# Altium PCB sensor-node-pcbdoc.pcbdoc
Units mil, origin at the board's own origin, x right, y up, seen from the top; angles counter-clockwise.
Board outline 3355 x 3685 mil, 2 copper layers (Top Layer, Bottom Layer); 28 components, 35 nets, 175 pads, 56 vias.
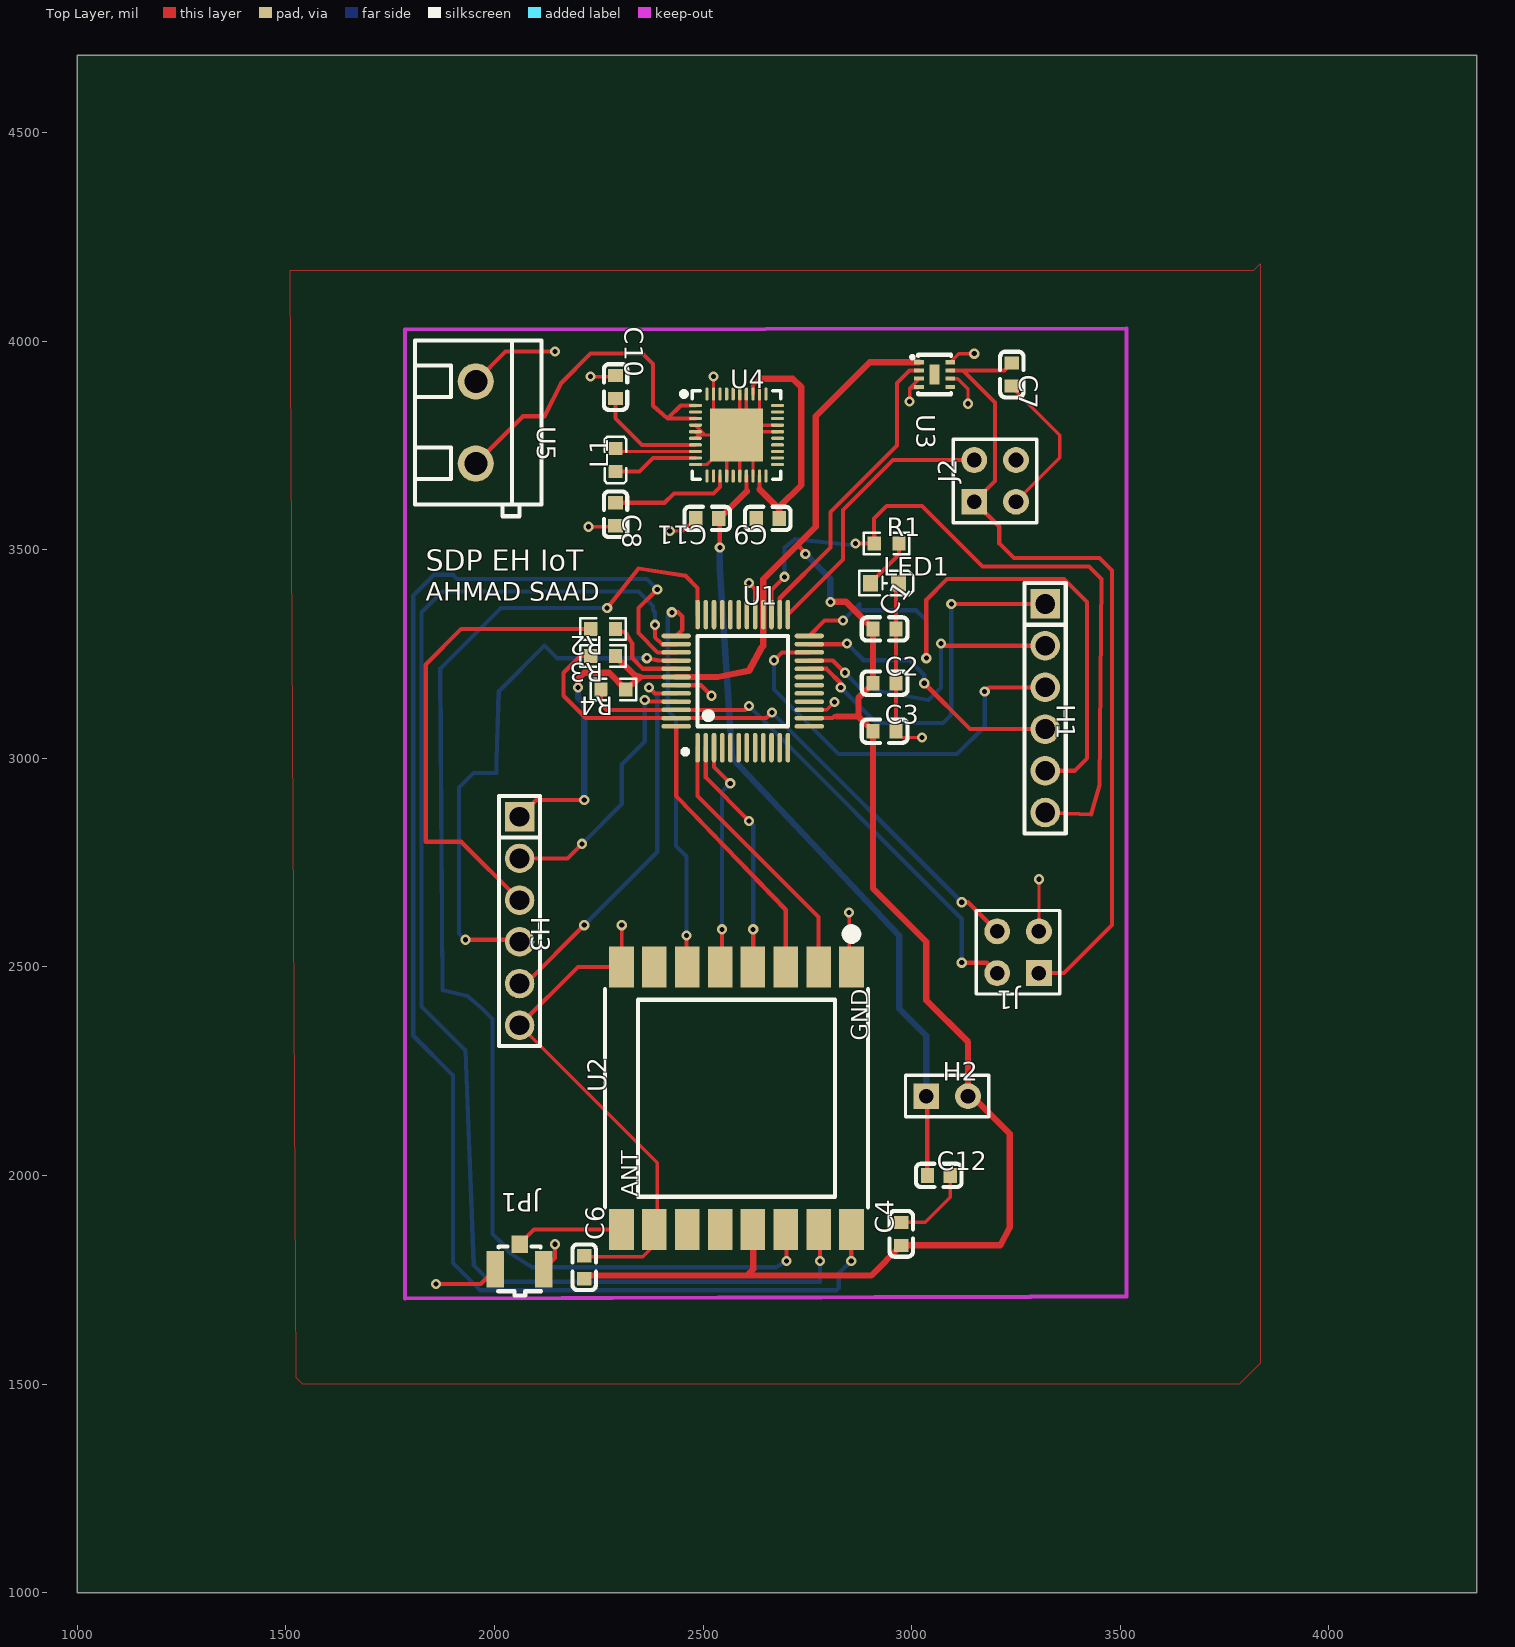
[diagram p0: Top Layer view]
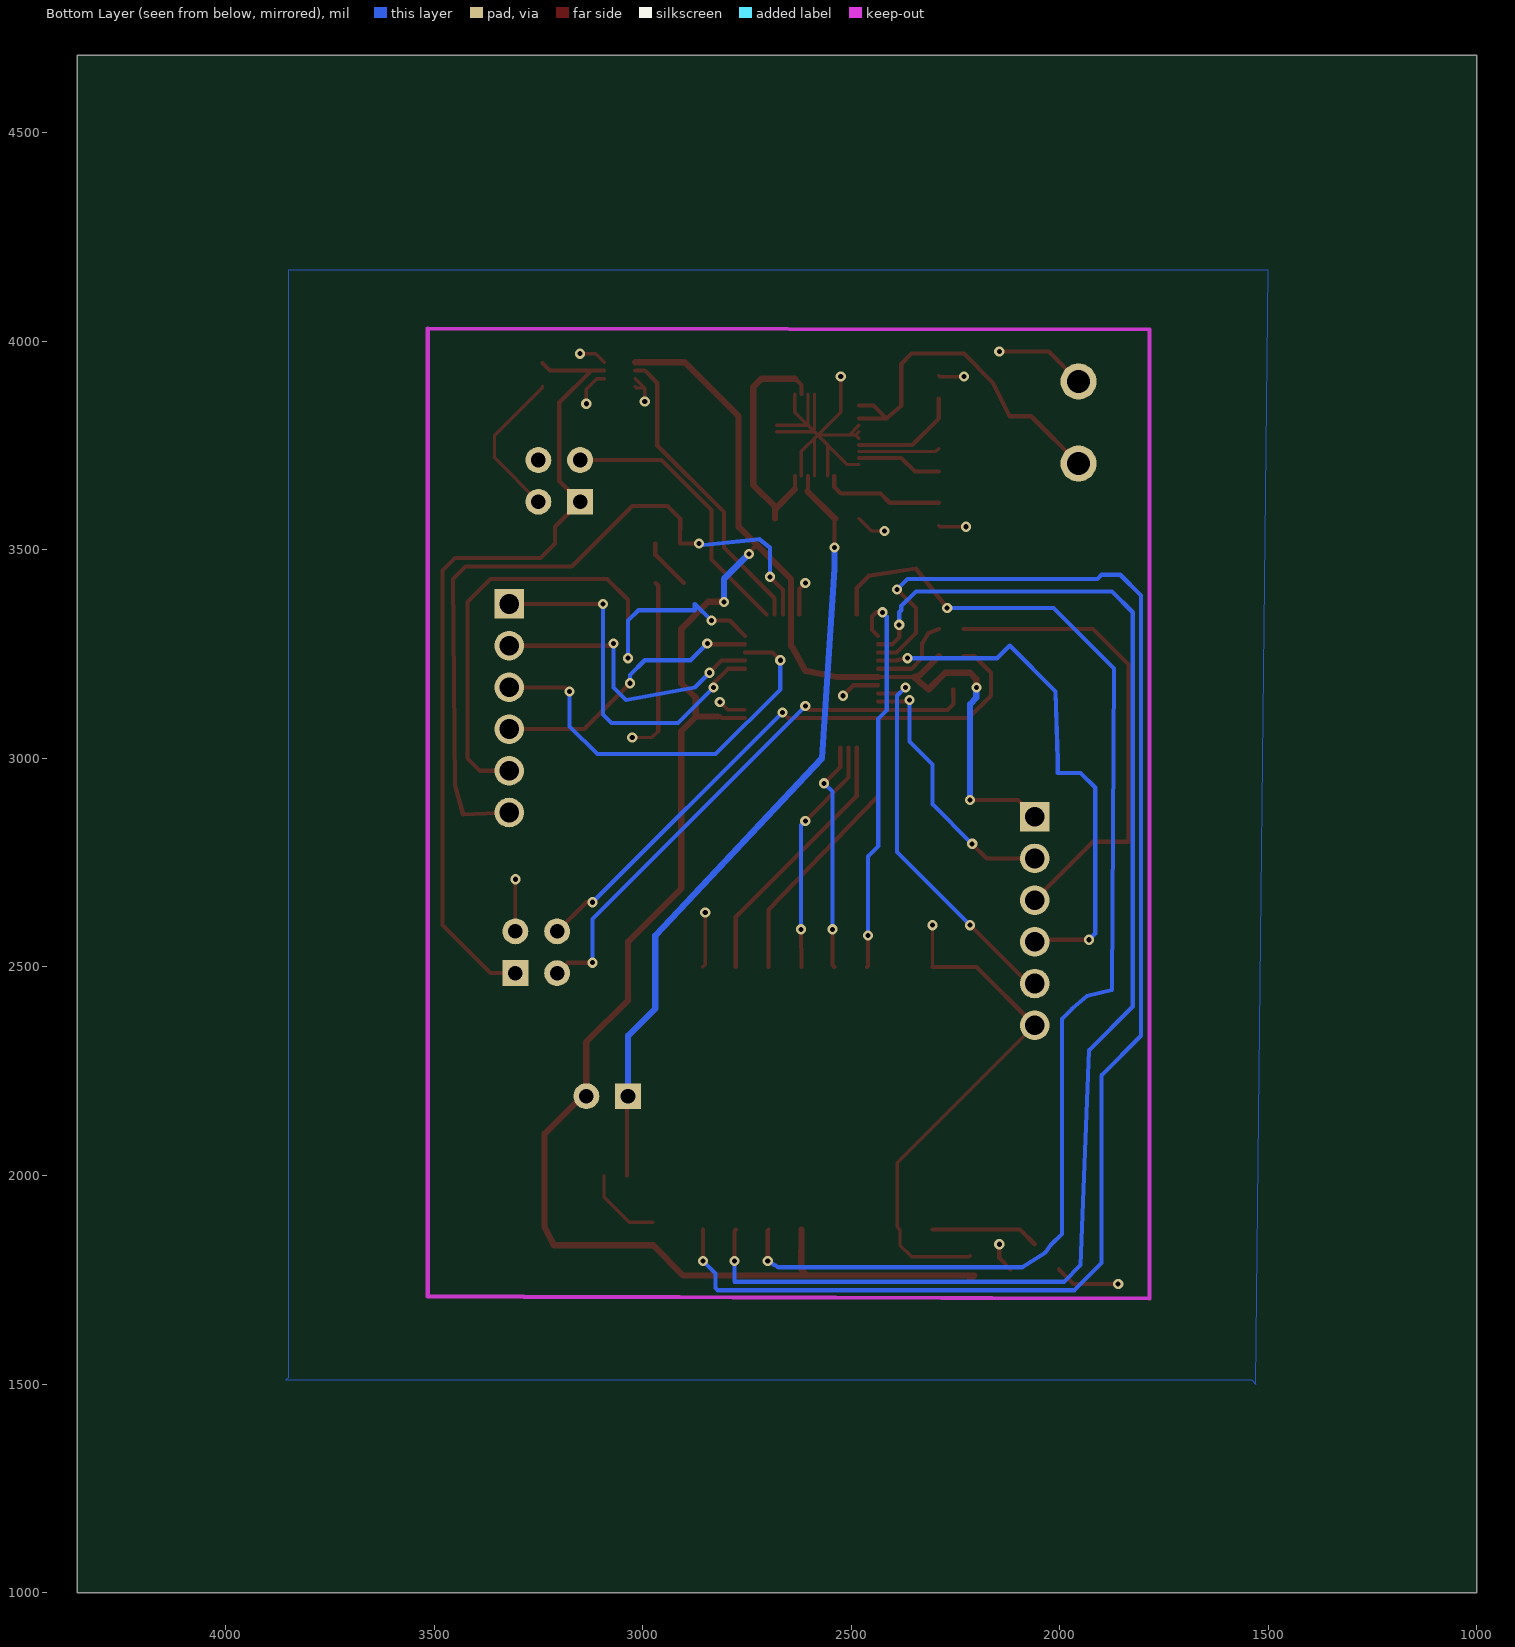
[diagram p1: Bottom Layer view, seen from below]

## Layer stack, top to bottom
Top Layer: signal copper (thickness not stored)
Dielectric: dielectric 12.6, FR-4, Dk 4.8
Bottom Layer: signal copper (thickness not stored)

## Board outline
4355,1000 1000,1000 1000,4685 4355,4685

## Components (designator, comment, footprint, x,y, rotation, side; value= is the part's Value field where it differs from the comment)
C1 "0.1u" C0603 2935,3310 r0 top
C2 "0.1u" C0603 2935,3180 r0 top
C3 "0.1u" C0603 2935,3065 r0 top
C4 "10u" C0603 2975,1860 r90 top
C6 "10u" C0603 2215,1780 r90 top
C7 "10u" C0603 3240,3920 r270 top
C8 "10u" C0603 2290,3585 r270 top
C9 "1F" C0603 2655,3575 r180 top
C10 "22u" C0603 2290,3890 r270 top
C11 "47u" C0603 2510,3575 r180 top
C12 "47u" C0603 3065,2000 r0 top
H1 "A2541WV-6P" HDR-TH_6P-P2.54-V-M-1 3320,3120 r270 top
H2 "HDR-F-2.54_1x2" HDR-F-2.54_1X2 3085,2190 r0 top
H3 "A2541WV-6P" HDR-TH_6P-P2.54-V-M-1 2060,2610 r270 top
J1 "HDR-M-2.54_2x2" HDR-M-2.54_2X2 3255,2535 r180 top
J2 "HDR-M-2.54_2x2" HDR-M-2.54_2X2 3200,3665 r90 top
JP1 "U.FL-R-SMT-1(80)" RF-SMD_FRF05002-JSS103M 2060,1805 r180 top
L1 "10u" L0603 2290,3715 r90 top
LED1 "YLED0603R" LED0603-FD 2935,3420 r0 top
R1 "1k" R0603 2940,3515 r0 top
R2 "4.7K" R0603 2260,3310 r180 top
R3 "10k" R0603 2260,3245 r180 top
R4 "10k" R0603 2285,3165 r180 top
U1 "ATMEGA4809-AUR" TQFP-48_L7.0-W7.0-P0.50-LS9.0-BL 2595,3185 r0 top
U2 "SX1276S9S+T-X1" WIRELM-SMD_SX1278S165SY-T-X1 2580,2185 r90 top
U3 "MIC94069YML-TR" MLF-8_L2.0-W2.0-P0.50-BL-EP 3055,3920 r270 top
U4 "AEM10330-QFN" WQFN-40_L5.0-W5.0-P0.40-TL-EP3.2 2580,3775 r0 top
U5 "KF301-5.0-2P" CONN-TH_P5.00_KF301-5.0-2P 1955,3805 r270 top

## Footprints (in the part's own frame and the unit in brackets; to place one, negate y for a bottom-side part, rotate by r counter-clockwise, add the part's x,y. Pads: shape width x height; smd on the part's side, far side on the other; paste and mask are expansions set on the pad)
C0603 [mm]
  rect 0.8x0.9 smd paste+0 mask+0.051: 1(-0.7,0) 2(0.7,0)
  silkscreen extent -1.39,-0.71 1.39,0.71
CONN-TH_P5.00_KF301-5.0-2P [mm]
  round 2.2 hole 1.4 paste+0 mask+0.05: 1(-2.5,0) 2(2.5,0)
  silkscreen extent -5,-3.7 5.71,4
HDR-F-2.54_1X2 [mil]
  rect 62x62 hole 35 paste+0 mask+2: 1(-50,0)
  round 62 hole 35 paste+0 mask+2: 2(50,0)
  silkscreen extent -100,-49 100,50
HDR-M-2.54_2X2 [mil]
  rect 62x62 hole 35 paste+0 mask+2: 1(-50,50)
  round 62 hole 35 paste+0 mask+2: 2(50,50) 3(-50,-50) 4(50,-50)
  silkscreen extent -100,-100 100,100
HDR-TH_6P-P2.54-V-M-1 [mm]
  rect 1.8x1.8 hole 1.2 paste+0 mask+0.051: 1(-6.35,0)
  round 1.8 hole 1.2 paste+0 mask+0.051: 2(-3.81,0) 3(-1.27,0) 4(1.27,0) 5(3.81,0) 6(6.35,0)
  silkscreen extent -7.62,-1.25 7.62,1.25
L0603 [mm]
  rect 0.8x0.864 smd paste-100 mask+0.051: 1(-0.7,0) 2(0.7,0)
  silkscreen extent -1.42,-0.65 1.42,0.65
LED0603-FD [mm]
  rect 0.9x1 smd paste+0 mask+0.051: 1(-0.85,0) 2(0.85,0)
  silkscreen extent -1.55,-0.75 1.75,0.75
MLF-8_L2.0-W2.0-P0.50-BL-EP [mm]
  rect 0.25x0.6 smd paste+0 mask+0.051: 1(-0.75,-0.95) 2(-0.25,-0.95) 3(0.25,-0.95) 4(0.75,-0.95) 5(0.75,0.95) 6(0.25,0.95) 7(-0.25,0.95) 8(-0.75,0.95)
  rect 1.2x0.6 smd paste+0 mask+0.051: 9(0,0)
  silkscreen extent -1.2,-1.45 1.2,1
R0603 [mil]
  rect 31.75x34.02 smd paste-3937.01 mask+2: 1(-29.66,0) 2(29.66,0)
  silkscreen extent -55,-26 55,26
RF-SMD_FRF05002-JSS103M [mm]
  rect 1x1.05 smd paste+0 mask+0.05: 1(0,-0.762)
  rect 1.05x2.2 smd paste+0 mask+0.05: 2(-1.475,0.762) 3(1.475,0.762)
  silkscreen extent -1.3,-0.63 1.3,2.35
TQFP-48_L7.0-W7.0-P0.50-LS9.0-BL [mm]
  oval 0.28x1.8 smd paste+0 mask+0.051: 1(-2.75,-4.05) 2(-2.25,-4.05) 3(-1.75,-4.05) 4(-1.25,-4.05) 5(-0.75,-4.05) 6(-0.25,-4.05) 7(0.25,-4.05) 8(0.75,-4.05) 9(1.25,-4.05) 10(1.75,-4.05) 11(2.25,-4.05) 12(2.75,-4.05) 25(2.75,4.05) 26(2.25,4.05) 27(1.75,4.05) 28(1.25,4.05) 29(0.75,4.05) 30(0.25,4.05) 31(-0.25,4.05) 32(-0.75,4.05) 33(-1.25,4.05) 34(-1.75,4.05) 35(-2.25,4.05) 36(-2.75,4.05)
  oval 1.8x0.28 smd paste+0 mask+0.051: 13(4.05,-2.75) 14(4.05,-2.25) 15(4.05,-1.75) 16(4.05,-1.25) 17(4.05,-0.75) 18(4.05,-0.25) 19(4.05,0.25) 20(4.05,0.75) 21(4.05,1.25) 22(4.05,1.75) 23(4.05,2.25) 24(4.05,2.75) 37(-4.05,2.75) 38(-4.05,2.25) 39(-4.05,1.75) 40(-4.05,1.25) 41(-4.05,0.75) 42(-4.05,0.25) 43(-4.05,-0.25) 44(-4.05,-0.75) 45(-4.05,-1.25) 46(-4.05,-1.75) 47(-4.05,-2.25) 48(-4.05,-2.75)
  silkscreen extent -3.65,-4.45 2.75,2.75
WIRELM-SMD_SX1278S165SY-T-X1 [mm]
  rect 2.5x1.5 smd paste+0 mask+0.051: 1(8,-7) 2(8,-5) 3(8,-3) 4(8,-1) 5(8,1) 6(8,3) 7(8,5) 8(8,7) 9(-8,7) 10(-8,5) 11(-8,3) 12(-8,1) 13(-8,-1) 14(-8,-3) 15(-8,-5) 16(-8,-7)
  silkscreen extent -6.64,-8 10.3,8
WQFN-40_L5.0-W5.0-P0.40-TL-EP3.2 [mm]
  oval 0.8x0.2 smd paste-100 mask+0.051: 1(-2.5,1.8) 2(-2.5,1.4) 3(-2.5,1) 4(-2.5,0.6) 5(-2.5,0.2) 6(-2.5,-0.2) 7(-2.5,-0.6) 8(-2.5,-1) 9(-2.5,-1.4) 10(-2.5,-1.8) 21(2.5,-1.8) 22(2.5,-1.4) 23(2.5,-1) 24(2.5,-0.6) 25(2.5,-0.2) 26(2.5,0.2) 27(2.5,0.6) 28(2.5,1) 29(2.5,1.4) 30(2.5,1.8)
  oval 0.2x0.8 smd paste-100 mask+0.051: 11(-1.8,-2.5) 12(-1.4,-2.5) 13(-1.001,-2.5) 14(-0.599,-2.5) 15(-0.201,-2.5) 16(0.201,-2.5) 17(0.599,-2.5) 18(1.001,-2.5) 19(1.399,-2.5) 20(1.8,-2.5) 31(1.8,2.5) 32(1.399,2.5) 33(1.001,2.5) 34(0.599,2.5) 35(0.2,2.5) 36(-0.201,2.5) 37(-0.6,2.5) 38(-1.001,2.5) 39(-1.4,2.5) 40(-1.8,2.5)
  rect 3.2x3.2 smd paste-100 mask+0.051: 41(0,0)
  silkscreen extent -3.35,-2.7 2.7,2.7

## Via types
v1: diameter 24.41, hole 12.2, Top Layer to Bottom Layer, tented both sides, 56 vias

## Nets (pads, with @x,y where several pads share a name; then routed paths per layer and width w, separated by ;. In a path a pad name is that pad's centre, name@x,y a point inside that pad or via, vN(x,y) a via of type N, cw(c..) or ccw(c..) an arc to the next point about the centre after c; other vN are vias at no path point)
3V3: C1.1 C2.1 C3.1 C4.1 C6.1 H2.2 H3.1 R3.1 R4.1 U1.14 U1.28 U1.42 U2.13 U3.1 | length 5192.1
  Top Layer w10: H3.1 2100,2900 v1(2215,2900) ; 2349.66,3194.84 U1.42 ; 2731.45,3506.45 2745,3492.89 v1(2745,3490) ; U1.14 2810,3096.42 2815,3101.42
  Top Layer w15: v1(2200,3170) 2200,3190 2215,3205 2274.66,3205 R4.1 2349.66,3194.84 2334.66,3200 R3.1 ; C6.1 2212.56,1752.44 2205,1760 2605,1760 ; U1.42 2535,3195 2610,3210 2640,3265 2644.21,3269.21 U1.28 ; U2.13 2620,1775 2605,1760 ; U1.28@2644.2,3344.5 2644.2,3429.2 2770,3555 2770,3820 2899.5,3949.5 U3.1 ; v1(2805,3375) 2842.44,3375 C1.1 C2.1 2872.44,3145 2872.44,3100 ; 2820,3100 2872.44,3100 ; C3.1 2907.4,2687.6 3035,2560 3035,2420 3135,2320 H2.2 3145,2190 3235,2100 3235,1875 3212.4,1832.4 C4.1 ; C3.1 2872.44,3100 ; C4.1 2902.56,1760 2605,1760
  Bottom Layer w15: v1(2200,3170) 2200,3145 2215,3130 v1(2215,2900) ; v1(2745,3490) 2805,3430 v1(2805,3375)
3V3_IN: C11.1 C12.1 H2.1 U4.17 | length 1894.5
  Top Layer w10: C11.1 2540,3572.56 v1(2540,3505) ; 2603.59,3640 U4.17 ; H2.1 3037.44,2187.56 C12.1
  Top Layer w15: C11.1 2540,3575 2605,3640
  Bottom Layer w15: v1(2540,3505) 2540,3455 2570,3000 2970,2575 2970,2400 3035,2335 H2.1
ANT: JP1.1 U2.9 | length 258.9
  Top Layer w10: JP1.1 2095.03,1870.04 U2.9
CO_ANLG: J2.2 U1.25 | length 669.8
  Top Layer w10: U1.25 2835,3476.18 2835,3595 2955,3715 J2.2
D22A0: H1.1 U1.20 | length 898.4
  Top Layer w10: U1.20 2795.5,3214.5 2830,3180 v1(2830,3170) ; v1(3095,3370) H1.1
  Bottom Layer w10: v1(2830,3170) 2915,3085 3075,3085 3095,3105 v1(3095,3370)
D23A1: H1.2 U1.21 | length 714.4
  Top Layer w10: U1.21 2810.79,3234.21 v1(2840,3205) ; v1(3070,3275) 3075,3270 H1.2
  Bottom Layer w10: v1(2840,3205) 2875,3170 3040,3140 3070,3170 v1(3070,3275)
D24A2: H1.3 U1.22 | length 991.6
  Top Layer w10: v1(2670,3235) 2688.9,3253.9 U1.22 ; v1(3175,3160) 3185,3170 H1.3
  Bottom Layer w10: v1(2670,3235) 2670,3165 2825,3010 3108.4,3010 3175,3076.6 v1(3175,3160)
D25A3: H1.4 U1.23 | length 662.8
  Top Layer w10: U1.23 2843.58,3273.58 v1(2845,3275) ; v1(3030,3180) 3140,3070 H1.4
  Bottom Layer w10: v1(2845,3275) 2885,3235 2995,3235 3030,3200 v1(3030,3180)
D26A4: H1.5 U1.24 | length 1483.6
  Top Layer w10: U1.24 2791.18,3330 v1(2835,3330) ; v1(3035,3240) 3035,3380 3085,3430 3365,3430 3420,3375 3420,3000 3390,2970 H1.5
  Bottom Layer w10: v1(2835,3330) 2875,3370 2875,3355 3010,3355 3035,3330 v1(3035,3240)
D27A5: H1.6 R1.1 U1.27 | length 1769.4
  Top Layer w10: U1.27 2663.9,3403.9 v1(2695,3435) ; v1(2865,3515) R1.1 ; R1.1 2910,3575 2940,3605 3025,3605 3170,3460 3425,3460 3455,3430 3450,2935 3430,2865 H1.6
  Bottom Layer w10: v1(2695,3435) 2695,3505 2720,3525 2865,3510 v1(2865,3515)
DIO0: U1.36 U2.14 | length 3043.9
  Top Layer w10: v1(2270,3360) 2345,3455 2457.5,3437.5 2486.7,3408.3 U1.36@2486.7,3344.5 ; U2.14 2700,1868.15 v1(2700,1795)
  Bottom Layer w10: v1(2270,3360) 2015,3360 1870,3215 1875,2445 1935,2430 1970,2400 1995,2375 1995,1860 2020,1835 2035,1815 2090,1780 2675,1780 v1(2700,1795)
DIO1: U1.38 U2.15 | length 3306.4
  Top Layer w10: v1(2385,3320) 2385,3290 2401.42,3273.58 U1.38 ; U2.15@2776.85,1870.04 2780,1866.89 v1(2780,1795)
  Bottom Layer w10: v1(2385,3320) 2385,3350 2380,3355 2380,3365 2345,3400 1875,3400 1825,3350 1825,2405 1930,2300 1950,1785 1990,1745 2780,1745 v1(2780,1795)
DIO2: U1.39 U2.16 | length 3773.9
  Top Layer w10: v1@2390,3410 v1(2390,3405) 2345,3360 ; v1(2855,1795) U2.16 ; 2345,3300 2391.1,3253.9 ; 2345,3300 2345,3360 ; 2345,3300 2391.1,3253.9 ; 2345,3300 2345,3360 ; 2391.1,3253.9 U1.39 2391.1,3253.9
  Bottom Layer w10: v1(2390,3405) 2365,3430 1910,3430 1900,3440 1855,3440 1805,3390 1805,2335 1900,2240 1900,1790 1965,1725 2820,1725 2825,1730 2825,1765 v1(2855,1795)
GND: C1.2 C2.2 C3.2 C4.2 C6.2 C7.2 C8.2 C9.2 C10.1 C11.2 C12.2 H3.6 J1.3 J2.3 JP1.2 JP1.3 LED1.2 U1.15 U1.29 U1.43 U2.1 U2.8 U2.10 U3.3 U3.4 U3.6 U3.8 U4.4 U4.5 U4.6 U4.10 U4.14 U4.16 U4.18 U4.26 U4.27 U4.32 U4.34 U4.35 U4.39 U4.41 U5.1 | length 5101.1
  Top Layer w8: H3.6 2390,2030 2390,1876.89 2383.15,1870.04 2383.15,1833.15 2355,1805 2217.56,1805 C6.2 ; v1(2225,3555) 2287.56,3555 C8.2 ; v1(2230,3915) 2287.44,3915 C10.1 ; U2.8 2305,2500.55 v1(2305,2600) ; v1(2420,3545) 2452.44,3545 C11.2 ; U4.10 2509.13,3704.13 U4.41 ; U4.6 2489.45,3775 ; U4.5 2489.45,3775 ; U4.4 2505.2,3775 U4.41 ; v1(2525,3915) 2525,3873.53 U4.39 2524.89,3830.11 U4.41 ; U4.14 2556.4,3751.4 U4.41 ; U4.16 2587.9,3767.1 U4.41 ; U4.35 2587.9,3782.9 U4.41 ; U4.34 U4.41@2603.59,3798.59 ; U4.18 2619.4,3735.6 U4.41 ; U4.32 2635.1,3830.1 U4.41 ; U4.26 2587.87,3782.87 U4.41 ; U4.27 U4.41@2603.62,3798.62 ; U1.15 2796.1,3116.1 v1(2815,3135) ; v1(2850,2630) 2850,2505.55 U2.1 ; C3.2 2977.56,3050 v1(3025,3050) ; C4.2 3032.6,1887.6 3092.6,1947.6 C12.2 ; v1(2995,3855) 2995,3887.56 ; U3.4 3014.69,3887.56 2995,3887.56 ; U3.3 2995,3887.56 ; U3.6 3109.84,3910.16 3135,3885 v1(3135,3850) ; U3.8 3112.87,3970 v1(3150,3970) ; C7.2 3240,3890 3355,3775 3355,3720 J2.3 ; J1.3 v1(3305,2710) ; 2489.45,3775 U4.41 ; 2489.45,3775 U4.41 ; U4.41 U4.41@2603.59,3798.59 ; U4.41 U4.41@2603.62,3798.62
  Top Layer w10: v1(1860,1740) 1966.94,1740 JP1.3 ; U5.1 2026.58,3975 v1(2145,3975) ; H3.6 2199.96,2499.96 U2.8 ; JP1.2 2145,1801.92 v1(2145,1835) ; U1.43 2494.84,3175.16 v1(2520,3150) ; v1(2610,3420) 2624.53,3405.47 U1.29 ; C3.2 C2.2 C1.2 2962.56,3414.09 LED1.2
MIC_ENA: U1.26 U3.2 | length 737.1
  Top Layer w10: U1.26 2683.58,3383.58 2805,3505 2805,3590 2965,3750 2965,3900 2994.8,3929.8 U3.2
MISO: U1.1 U2.2 | length 645.8
  Top Layer w10: U1.1 2486.73,2910 2776.85,2619.88 U2.2@2776.85,2499.96
MOSI: U1.48 U2.3 | length 682.7
  Top Layer w10: U1.48 2435.55,2909.45 2440,2905 2698.11,2636.89 U2.3
NSS: U1.3 U2.5 | length 551.8
  Top Layer w10: U1.3 2526.1,2978.9 2550,2955 v1(2565,2940) ; U2.5 2545,2504.33 v1(2545,2590)
  Bottom Layer w10: v1(2545,2590) 2545,2920 v1(2565,2940)
R1_2: LED1.1 R1.2 | length 123.2
  Top Layer w10: LED1.1 2969.66,3488.12 R1.2
RESET: H3.4 U1.40 | length 1286.9
  Top Layer w10: v1(1930,2565) 2055,2565 H3.4 ; v1(2365,3240) 2390,3235 U1.40
  Bottom Layer w10: v1(1930,2565) 1915,2580 1915,2930 1950,2965 2005,2965 2005,2995 2010,3160 2120,3270 2150,3240 v1(2365,3240)
RX0: H3.2 U1.45 | length 648.9
  Top Layer w10: H3.2 2175,2760 v1(2210,2795) ; v1(2360,3140) 2364.21,3135.79 U1.45
  Bottom Layer w10: v1(2210,2795) 2305,2890 2305,2985 2360,3040 v1(2360,3140)
SCK: U1.2 U2.4 | length 572.6
  Top Layer w10: U1.2 2506.42,2953.58 v1(2610,2850) ; U2.4 v1(2620,2590)
  Bottom Layer w10: v1(2610,2850) 2620,2840 v1(2620,2590)
SCL: J1.4 R3.2 U1.47 | length 1422.2
  Top Layer w10: R3.2 2205,3245 2165,3205 2165,3150 2218.58,3096.42 U1.47 2651.42,3096.42 v1(2665,3110) ; v1(3120,2655) 3135,2655 J1.4
  Bottom Layer w10: v1(2665,3110) v1(3120,2655)
SDA: J1.2 R4.2 U1.46 | length 1321
  Top Layer w10: R4.2 2255,3130 2268.9,3116.1 U1.46 2601.1,3116.1 v1(2610,3125) ; v1(3120,2510) 3180,2510 J1.2
  Bottom Layer w10: v1(2610,3125) 3120,2615 v1(3120,2510)
SXRST: U1.37 U2.6 | length 955.5
  Top Layer w10: v1(2425,3350) 2440,3350 2450,3340 2450,3307.72 U1.37 ; v1(2460,2575) 2460,2501.85 U2.6
  Bottom Layer w10: v1(2425,3350) 2415,3340 2415,3115 2435,3095 2435,2790 2460,2765 v1(2460,2575)
TX0: H3.5 U1.44 | length 935.3
  Top Layer w10: H3.5 2075,2460 v1(2215,2600) ; v1(2370,3170) 2384.53,3155.47 U1.44
  Bottom Layer w10: v1(2215,2600) 2390,2775 2390,3150 v1(2370,3170)
U1_41: R2.1 U1.41 | length 207.5
  Top Layer w10: R2.1 2315,3300 2330,3275 2330,3240 2355.47,3214.53 U1.41
U4_1: U4.1 U4.3 U5.2 | length 853.5
  Top Layer w10: U5.2 2068.43,3820 2120,3820 2160,3900 2230,3970 2355,3970 2380,3945 2380,3845 2415,3814.4 ; U4.3 2415,3814.4 ; U4.1 2446.47,3845.87 2415,3814.4
U4_7: C10.2 U4.7 | length 265.3
  Top Layer w10: C10.2 2290,3815 2353.62,3751.38 U4.7
U4_8: L1.2 U4.8 | length 194.5
  Top Layer w8: L1.2 2296.93,3735.63 U4.8
U4_9: L1.1 U4.9 | length 205
  Top Layer w10: L1.1 2347.4,3687.4 2380.1,3719.9 U4.9
UPDI: H3.3 R2.2 | length 1138.5
  Top Layer w10: H3.3 1920,2800 1835,2800 1835,3225 1920,3310 R2.2
VCC_SENS: C7.1 J1.1 J2.1 U3.7 | length 2016.9
  Top Layer w10: U3.7 3222.28,3929.84 C7.1 ; 3122.75,3929.84 3200,3852.59 3200,3665 J2.1 3210,3555 3210,3515 3245,3480 3450,3480 3480,3450 3480,2600 3365,2485 J1.1
VINT: C8.1 U4.13 | length 292.3
  Top Layer w10: C8.1 2407.56,3612.56 2430,3635 2525,3635 2540.6,3650.6 U4.13
VSTO: C9.1 U4.19 U4.33 | length 586.7
  Top Layer w10: U4.33 2619.4,3894.4 2635,3910 ; 2635.1,3645 U4.19
  Top Layer w15: 2635,3910 2715,3910 2735,3890 2735,3655 2682.56,3602.56 2682.56,3597.54 ; 2635.1,3645 2682.56,3597.54 ; C9.1 2682.56,3597.54
pads on no net: J2.4 U1.4 U1.5 U1.6 U1.7 U1.8 U1.9 U1.10 U1.11 U1.12 U1.13 U1.16 U1.17 U1.18 U1.19 U1.30 U1.31 U1.32 U1.33 U1.34 U1.35 U2.7 U2.11 U2.12 U3.5 U3.9 U4.2 U4.11 U4.12 U4.15 U4.20 U4.21 U4.22 U4.23 U4.24 U4.25 U4.28 U4.29 U4.30 U4.31 U4.36 U4.37 U4.38 U4.40

## Polygon pours and split planes (outlines as drawn)
GND on Top Layer (solid): 1510,4170 3820,4170 3835,4185 3835,1550 3785,1500 1540,1500 1525,1515
GND on Bottom Layer (solid): 1500,4170 3850,4170 3850,1515 3855,1510 1540,1510 1530,1500

## Silkscreen, mask and mechanical layers (free items; w line width, h text height)
Top Overlay:
  text "SDP EH IoT" at 1835,3450 h50
  text "AHMAD SAAD" at 1835,3377.5 h45

## Text inside footprints (layer, text, board x,y; h text height)
U2: Top Overlay "GND" at 2894.97,2322.8 h39.37 r90; Top Overlay "ANT" at 2343.78,1948.78 h39.37 r90